# Altium PCB Propulsion_v2.PcbDoc
Units mil, origin at the board's own origin, x right, y up, seen from the top; angles counter-clockwise.
Board outline 2755.9 x 1870.08 mil, 2 copper layers (Top Layer, Bottom Layer), stack 62.441 mil thick; 23 components, 16 nets, 84 pads, 5 vias.
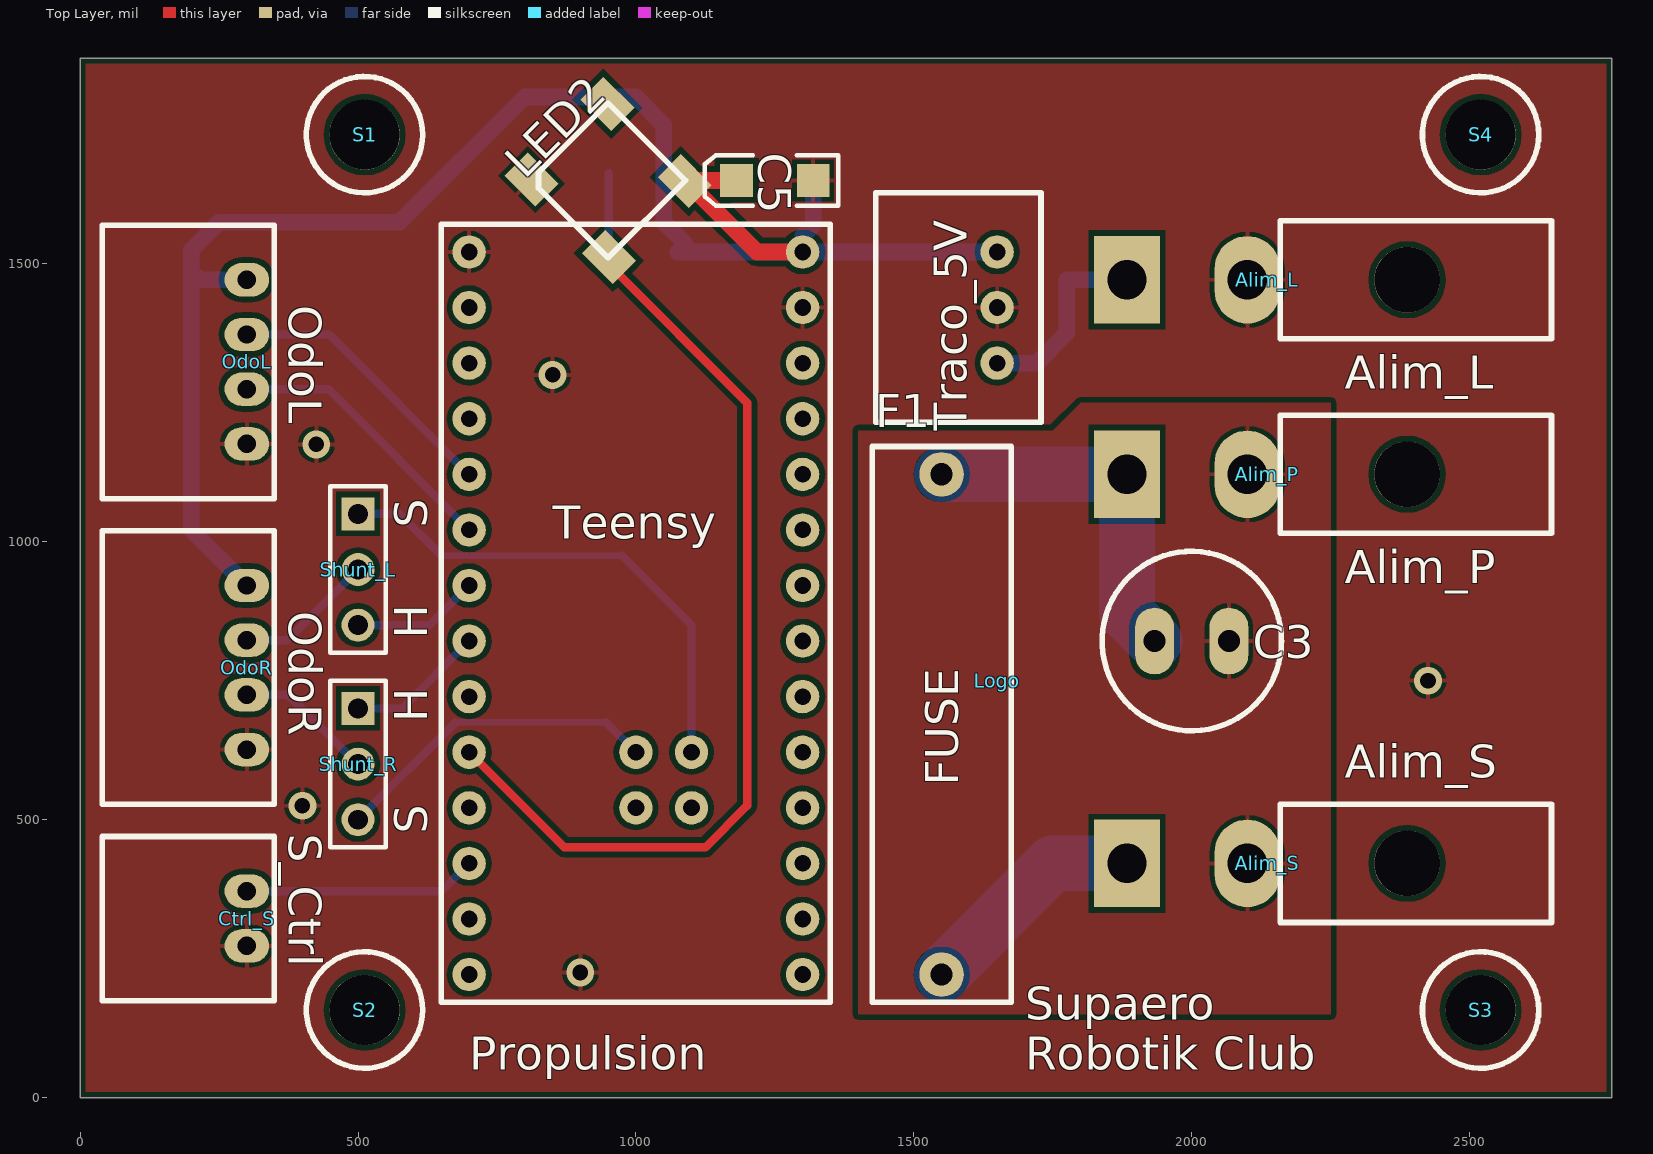
[diagram p0: Top Layer view]
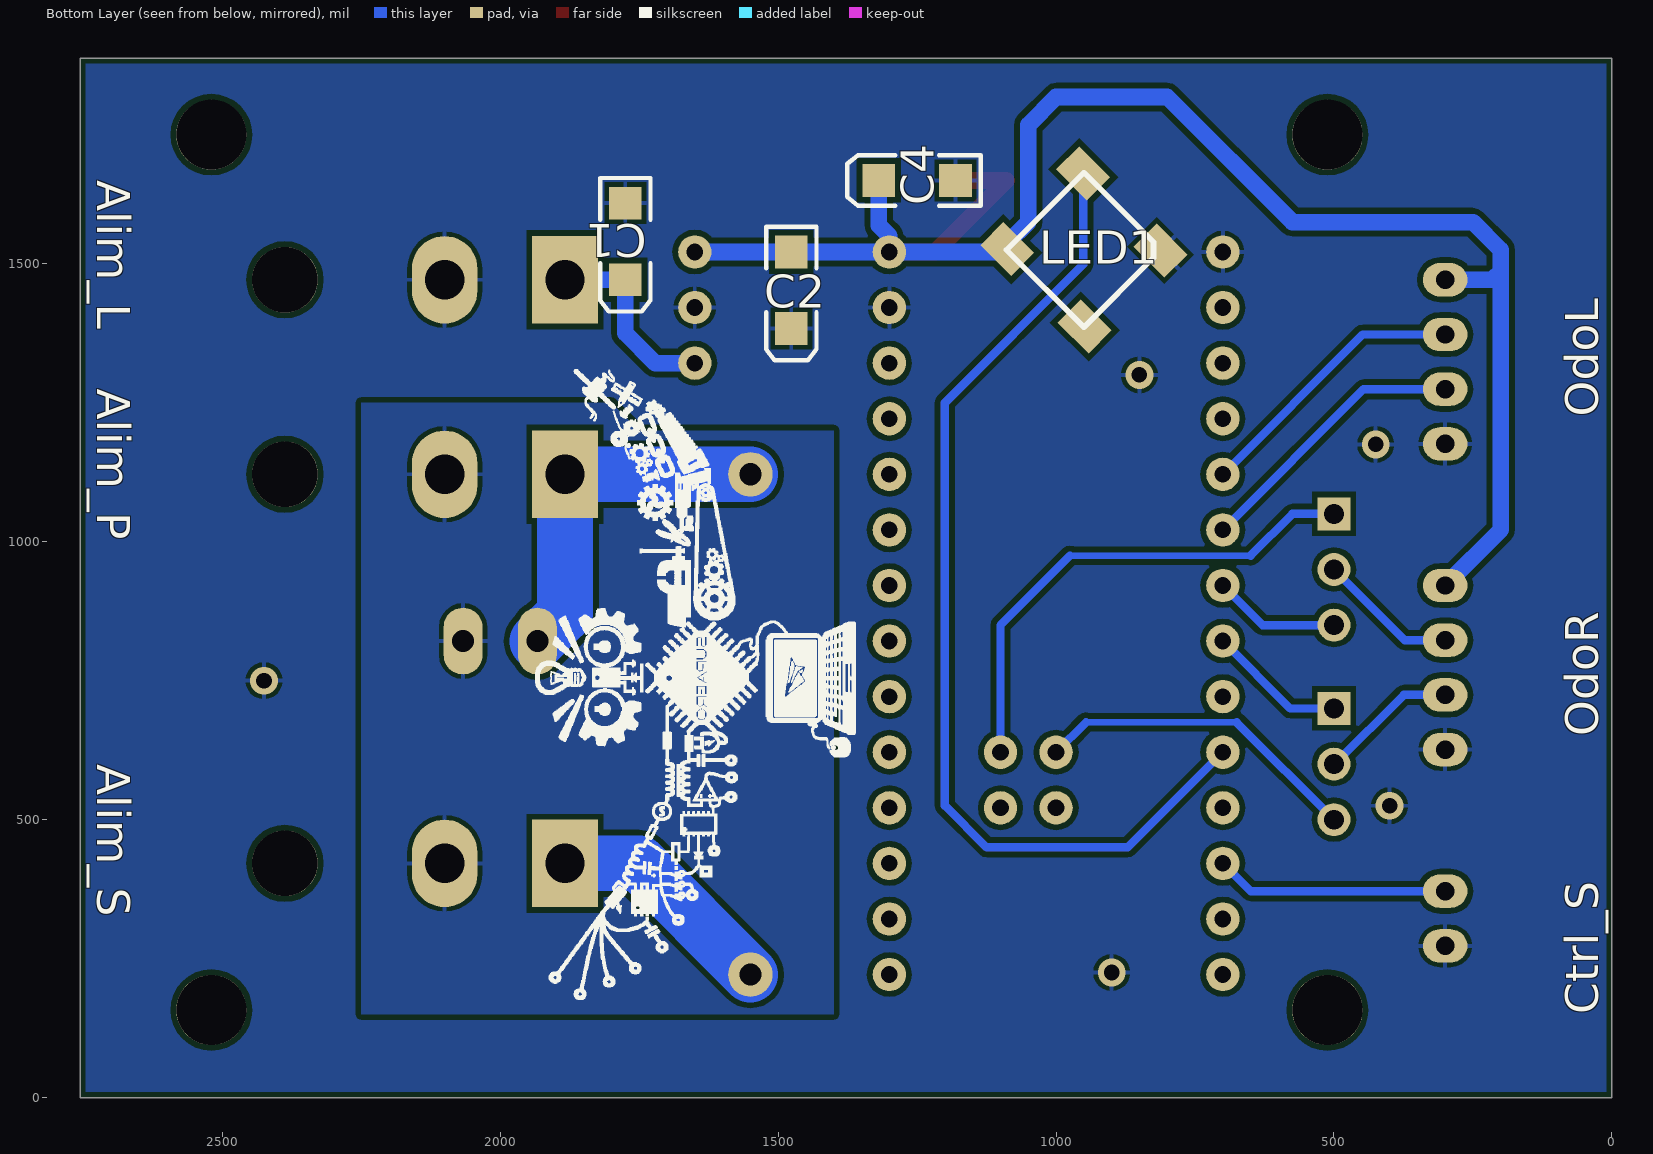
[diagram p1: Bottom Layer view, seen from below]
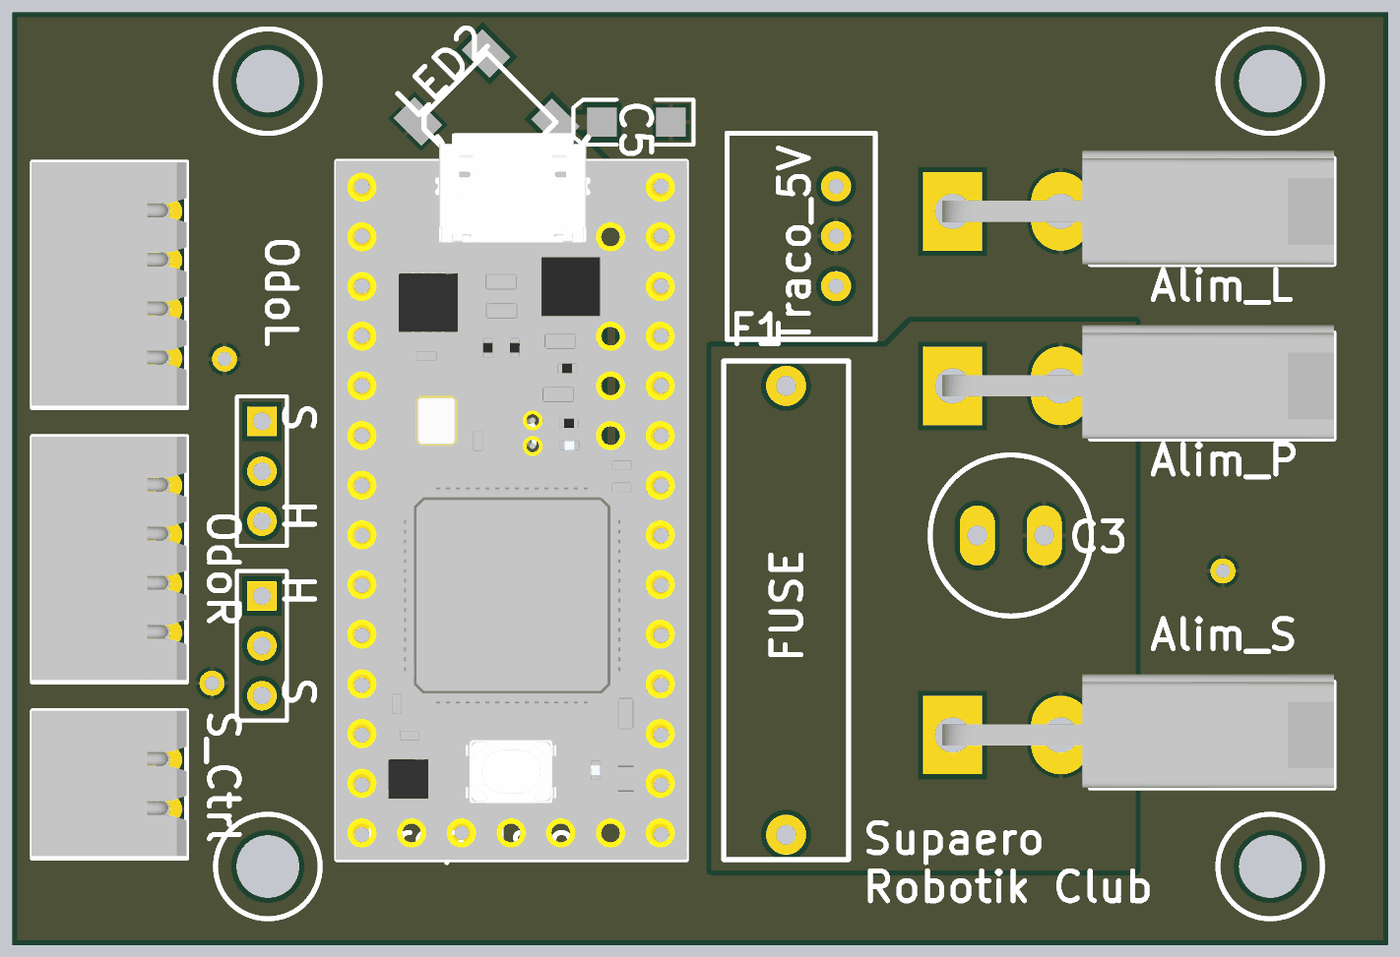
[diagram p2: 3D render of the assembled board from above, using the file's embedded part models]

## Layer stack, top to bottom
Top Solder: solder mask 0.4, Solder Resist, Dk 3.5
Top Layer: signal copper 0.7087
Dielectric1: core 61.0236, FR-4, Dk 4.8
Bottom Layer: signal copper 0.7087
Bottom Solder: solder mask 0.4, Solder Resist, Dk 3.5

## Board outline
0,0 0,1870.08 2755.9,1870.08 2755.9,0

## Design rules (kind name [scope] priority, off if disabled: settings)
BoardOutlineClearance [All] p1: gap=9.84 except(0: Arc-SplitContinuation Track-SplitContinuation SMDPad-SplitContinuation THPad-SplitContinuation Via-SplitContinuation Fill-SplitContinuation Poly-SplitContinuation Region-SplitContinuation Text-SplitContinuation)
Clearance Clearance-xPP-xTP-xTT [All] p1: gap=10
ComponentClearance [All] p1: gap=9.84 collisioncheckmode=3 verticalgap=9.84 showdistances=FALSE
ComponentClearance ComponentClearance_1 [InComponent('Logo')] p2: gap=0 collisioncheckmode=3 verticalgap=0 showdistances=FALSE
DiffPairsRouting [All] p1: maxlimit=9.84 minlimit=9.84 mostfreqgap=9.84 toplayer_minwidth=15 toplayer_maxwidth=15 toplayer_prefwidth=15 bottomlayer_minwidth=15 bottomlayer_maxwidth=15 bottomlayer_prefwidth=15 maxuncoupledlength=492.13
Height [All] p1: minheight=0 maxheight=984.25 prefheight=492.13
HoleSize HoleSize-PTH [All] p1: absolutevalues=TRUE maxlimit=78.74 minlimit=9.84 maxpercent=80.000 minpercent=20.000
HoleToHoleClearance [All] p1: gap=13.78 allowstackedmicrovias=TRUE
MinimumAnnularRing "Minimum IAR  >0.45mm" [((ObjectKind = 'Pad') OR (ObjectKind = 'Via')) And (Layer = 'MultiLayer') And (HoleDiameter > AsMM(0.45))] p1: minimumring=6.89 // minimum inner annular ring for pads > 0.45mm finished hole size
MinimumAnnularRing "Minimum IAR <=0.45mm" [((ObjectKind = 'Pad') OR (ObjectKind = 'Via')) And (Layer = 'MultiLayer') And (HoleDiameter <= AsMM(0.45))] p2: minimumring=6.89 // minimum inner annular ring for pads <= 0.45mm finished hole size
MinimumSolderMaskSliver [All] p1: minsoldermaskwidth=3.15
PlaneClearance PlaneClearance-IPI [All] p1: clearance=9.84
PlaneConnect [All] p1: planeconnectstyle=Relief reliefexpansion=6.89 reliefentries=4 reliefconductorwidth=7.87 reliefairgap=7.87
PolygonConnect PolygonConnect-xTW [All] p1: connectstyle=Relief reliefconductorwidth=7.87 reliefentries=4 polygonreliefangle="90 Angle" airgapwidth=7.87
RoutingCorners [All] p1: cornerstyle=45-Degree minsetback=98.43 maxsetback=98.43
RoutingVias "RoutingVias > 0.45mm" [(ObjectKind = 'Via') And (HoleDiameter > AsMM(0.45))] p1: holewidth=19.68 width=33.46 viastyle="Through Hole" minholewidth=19.68 minwidth=33.46 maxholewidth=35.43 maxwidth=49.21 // finishet hole size > 0.45mm
RoutingVias "RoutingVias <= 0.45mm" [(ObjectKind = 'Via') And (HoleDiameter <= AsMM(0.45))] p2: holewidth=11.81 width=25.59 viastyle="Through Hole" minholewidth=9.84 minwidth=23.62 maxholewidth=17.72 maxwidth=31.5 // finishet hole size <= 0.45mm
SilkToSilkClearance [All] p1: silktosilkclearance=7.87
SilkToSolderMaskClearance SilkscreenOverComponentPads [IsPad] p1: minsilkscreentomaskgap=7.87 clearancetoexposedcopper=TRUE
SolderMaskExpansion [All] p1: expansion=0
Width Width-xTW [All] p1: maxlimit=100 minlimit=10 preferedwidth=20
19 further rules are at their usual default settings.

## Components (designator, comment, footprint, x,y, rotation, side; value= is the part's Value field where it differs from the comment)
Alim_L "Minifit Jr 2x1H" MOLEX_MINIFITJR_2X1H 2100,1471.26 r0 top
Alim_P "Minifit Jr 2x1H" MOLEX_MINIFITJR_2X1H 2100,1121.26 r0 top
Alim_S "Minifit Jr 2x1H" MOLEX_MINIFITJR_2X1H 2100,421.26 r0 top
C1 "Cap22uF" 3.2X1.6X1.1 1775,1540.16 r270 bottom
C2 "Cap50uF" 3.2X1.6X1.1 1476.38,1452.36 r270 bottom
C3 "Cap50uF" CONDENSATEUR 2000,821.26 r0 top
C4 "Cap" 3.2X1.6X1.1 1250,1650 r0 bottom
C5 "Cap" 3.2X1.6X1.1 1250,1650 r180 top
Ctrl_S "SPOX 2x1H" "MOLEX SPOX 2X1H" 300,371.26 r270 top
F1 "10A" FUSE 1550,671.26 r90 top
LED1 "NeoPixel" Neopixel 950,1525 r135 bottom
LED2 "NeoPixel" Neopixel 950,1650 r225 top
Logo "Logo" LOGO_HIGHRES 1650,750 r270 top
OdoL "SPOX 4x1H" "MOLEX SPOX 4X1H" 300,1471.26 r270 top
OdoR "SPOX 4x1H" "MOLEX SPOX 4X1H" 300,921.26 r270 top
S1 "Screw M3" "SCREW M3" 511.81,1732.28 r0 top
S2 "Screw M3" "SCREW M3" 511.81,157.48 r0 top
S3 "Screw M3" "SCREW M3" 2519.68,157.48 r0 top
S4 "Screw M3" "SCREW M3" 2519.68,1732.28 r0 top
Shunt_L "Shunt selector" HDR1X3 500,1050 r270 top
Shunt_R "Shunt selector" HDR1X3 500,700 r270 top
Teensy "Teensy 3.2" TEENSY 600,721.26 r0 top
Traco_5V "Traco TRS2-2450" TRS0.5 1650,1421.26 r270 top

## Footprints (in the part's own frame and the unit in brackets; to place one, negate y for a bottom-side part, rotate by r counter-clockwise, add the part's x,y. Pads: shape width x height; smd on the part's side, far side on the other; paste and mask are expansions set on the pad)
3.2X1.6X1.1 [mm] "SMT LED; 2 Flat Leads"
  rect 1.5x1.5 smd: 1(-1.75,0) 2(1.75,0)
  silkscreen extent -2.9,-1.15 3.2,1.15
CONDENSATEUR [mil]
  oval 70x120 hole 40: 1(-66.93,0) 2(66.93,0)
  silkscreen extent -161,-161 161,161, body extent -161,-161 161,161, height 394
FUSE [mil]
  round 80 hole 40: 1(-450,0) 2(450,0)
  silkscreen extent -500,-125 500,125, body extent -505,-130 505,130, height 315
HDR1X3 [mm] "Connector; Header; 3 Position"
  rect 1.5x1.5 hole 0.9: 1(0,0)
  round 1.5 hole 0.9: 2(2.54,0) 3(5.08,0)
  silkscreen extent -1.27,-1.27 6.35,1.27
LOGO_HIGHRES [mil]
"MOLEX SPOX 2X1H" [mil] "Prise CI, Molex, 3 Contacts, 1 rangée, entraxe 2.5mm, 3A, Coudé, ref 22-03-5035"
  oval 60x80 hole 33: 1(0,0) 2(98.43,0)
  silkscreen extent -98,-260 197,49, body extent -98,-262 193,49, height 193
"MOLEX SPOX 4X1H" [mil] "Prise CI, Molex, 3 Contacts, 1 rangée, entraxe 2.5mm, 3A, Coudé, ref 22-03-5035"
  oval 60x80 hole 33: 1(0,0) 2(98.43,0) 3(196.85,0) 4(295.28,0)
  silkscreen extent -98,-260 394,49, body extent -98,-262 390,49, height 193
MOLEX_MINIFITJR_2X1H [mm] "Connecteur Molex 2"
  rect 3x4 hole 1.8: 1(-5.5,0)
  oval 3x4 hole 1.8: 2(0,0)
  round 3 hole 3 unplated: 3(7.3,0)
  silkscreen extent 1.5,-2.7 13.9,2.7, body extent -6.03,-2.7 13.9,3.1, height 11.01
Neopixel [mm]
  rect 1.5x2 smd: 1(2.45,-2.5) 2(2.45,2.5) 3(-2.45,2.5) 4(-2.45,-2.5)
  silkscreen extent -2.5,-2.5 2.5,2.5, body extent -2.5,-2.5 2.5,2.5, height 1.6
"SCREW M3" [mm] "M3 iso Screw"
  round 3.2 hole 3.2 unplated: 0(0,0)
  silkscreen extent -2.66,-2.66 2.66,2.66
TEENSY [mil] "Teensy 3.2"
  round 60 hole 30: 0(100,700) 1(100,600) 2(100,500) 3(100,400) 4(100,300) 5(100,200) 6(100,100) 7(100,0) 8(100,-100) 9(100,-200) 10(100,-300) 11(100,-400) 12(100,-500) 13(700,-500) 14(700,-400) 15(700,-300) 16(700,-200) 17(700,-100) 18(700,0) 19(700,100) 20(700,200) 21(700,300) 22(700,400) 23(700,500) 25(400,-100) 26(400,-200) 31(500,-200) 32(500,-100) 41(700,600) 42(700,700) 43(700,800) 44(100,800)
  silkscreen extent 50,-550 750,850, body extent 48,-550 752,907, height 505
TRS0.5 [mil]
  round 60 hole 30: 1(100,0) 2(0,0) 3(-100,0)
  silkscreen extent -207,-219 207,79, body extent -207,-218 207,79, height 402

## Part data
Alim_L Alim_P Alim_S: library part "Header 2", "Molex Minifit Jr 2x1H"
C1 C2 C3: library part Cap, "Capacitor"
C4 C5: "Capacitor"
Ctrl_S: library part "Header 2", "Molex SPOX Jr 2x1H"
F1: library part "Fuse 1", "Fuse"
OdoL OdoR: library part "Header 4H", "Molex SPOX 4x1H"
Shunt_L Shunt_R: library part "Header 3", "Header, 3-Pin"
Teensy: library part teensy3.2
Traco_5V: library part "Volt Reg", "Voltage Regulator"

## Via types
v1: diameter 50, hole 28, Top Layer to Bottom Layer, 5 vias

## Nets (pads, with @x,y where several pads share a name; then routed paths per layer and width w, separated by ;. In a path a pad name is that pad's centre, name@x,y a point inside that pad or via, vN(x,y) a via of type N, cw(c..) or ccw(c..) an arc to the next point about the centre after c; other vN are vias at no path point)
5VL: C2.1 C4.2 C5.2 LED1.3 LED2.3 OdoL.1 OdoR.1 Teensy.43 Traco_5V.3 | length 3032.3
  Top Layer w30: C5.2 1089.19,1650 1217.93,1521.26 Teensy.43
  Bottom Layer w30: 207.48,1478.74 214.96,1471.26 OdoL.1 ; OdoR.1 200,1021.26 200,1525 250,1575 575,1575 800,1800 1000,1800 1050,1750 1050,1575 1087.8,1537.2 LED1.3 ; LED1.3@1075,1521.26 Teensy.43 ; C4.2 1318.9,1568.9 1300,1550 Teensy.43 ; Traco_5V.3 C2.1 Teensy.43
24VL: Alim_L.1 C1.2 Traco_5V.1 | length 352
  Bottom Layer w30: Traco_5V.1 1721.26,1321.26 1775,1375 C1.2 Alim_L.1
24VP: Alim_P.1 C3.1 F1.2 | length 654
  Bottom Layer w100: F1.2 Alim_P.1 1883.46,870.87 C3.1
24VS: Alim_S.1 F1.1 | length 416.3
  Bottom Layer w100: F1.1 1750,421.26 Alim_S.1
A_L: OdoL.2 Teensy.3 | length 504.2
  Bottom Layer w15: OdoL.2 448.43,1372.83 Teensy.3
A_R: OdoR.2 Shunt_L.2 | length 255.7
  Bottom Layer w15: OdoR.2@302.17,825 OdoR.2 372.83,822.83 Shunt_L.2
A_R_HW: Shunt_L.1 Teensy.32 | length 911.6
  Bottom Layer w12: 650,975 975,975
  Bottom Layer w15: Shunt_L.1 575,1050 650,975 ; 975,975 1100,850 Teensy.32
A_R_SW: Shunt_L.3 Teensy.5 | length 229.5
  Bottom Layer w15: Shunt_L.3 628.74,850 Teensy.5
B_L: OdoL.3 Teensy.4 | length 504.9
  Bottom Layer w15: OdoL.3 446.85,1274.41 Teensy.4
B_R: OdoR.3 Shunt_R.2 | length 250.4
  Bottom Layer w15: OdoR.3 374.41,724.41 Shunt_R.2@498.82,600
B_R_HW: Shunt_R.3 Teensy.25 | length 594.7
  Bottom Layer w12: 675,675 946.26,675
  Bottom Layer w15: Shunt_R.3 675,675 ; 946.26,675 Teensy.25
B_R_SW: Shunt_R.1 Teensy.6 | length 250.2
  Bottom Layer w15: Shunt_R.1 578.74,700 Teensy.6
DIN: LED1.2 LED2.2 Teensy.8 | length 3535
  Top Layer w15: Teensy.8 871.26,450 1125,450 1200,525 1200,1250 951.39,1498.61 LED2.2
  Bottom Layer w15: Teensy.8 871.26,450 1125,450 1200,525 1200,1250 951.39,1498.61 LED1.2
GND: Alim_L.2 C1.1 C2.2 C4.1 C5.1 Ctrl_S.2 LED1.1 LED2.1 OdoL.4 OdoR.4 Teensy.42 Teensy.44 Traco_5V.2
  other v1: 900,225 400,525 2425,750 425,1175 850,1300
GNDP: Alim_P.2 Alim_S.2 C3.2
TX_SABER: Ctrl_S.1 Teensy.10 | length 420.7
  Bottom Layer w15: Ctrl_S.1 650,371.26 Teensy.10
pads on no net: Alim_L.3 Alim_P.3 Alim_S.3 LED1.4 LED2.4 S1.0 S2.0 S3.0 S4.0 Teensy.0 Teensy.1 Teensy.2 Teensy.7 Teensy.9 Teensy.11 Teensy.12 Teensy.13 Teensy.14 Teensy.15 Teensy.16 Teensy.17 Teensy.18 Teensy.19 Teensy.20 Teensy.21 Teensy.22 Teensy.23 Teensy.26 Teensy.31 Teensy.41

## Polygon pours and split planes (outlines as drawn)
GNDP on Bottom Layer "GNDP_L02_P000" (solid, pour order 0): 1400,1200 1750,1200 1800,1250 2250,1250 2250,150 1400,150
GND on Bottom Layer "GND_L02_P010" (solid, pour order 10): 0,0 0,1870.08 2755.91,1870.08 2755.91,0
GNDP on Top Layer "GNDP_L01_P004" (solid, pour order 4): 1400,1200 1750,1200 1800,1250 2250,1250 2250,150 1400,150
GND on Top Layer "GND_L01_P008" (solid, pour order 8): 0,1870.08 2755.91,1870.08 2755.91,0 0,0

## Silkscreen, mask and mechanical layers (free items; w line width, h text height)
Top Overlay:
  text "OdoL" at 375,1425 h60 r270
  text "Alim_L" at 2275,1275 h60
  text "S" at 625,1025 h60 r90
  text "Alim_P" at 2275,925 h60
  text "OdoR" at 375,875 h60 r270
  text "H" at 625,825 h60 r90
  text "H" at 625,675 h60 r90
  text "Alim_S" at 2275,575 h60
  text "S_Ctrl" at 375,475 h60 r270
  text "S" at 625,475 h60 r90
  text "Propulsion" at 700,50 h60
  text "Supaero / Robotik Club" at 1700,50 h60
Mechanical 1:
  the board outline again, w7.87

## Dimensions
0,0 to 2755.9,0 on Mechanical 15
0,0 to 0,1870.08 on Mechanical 15
511.81,1732.28 to 0,1870.08 on Mechanical 1
511.81,1732.28 to 0,1870.08 on Mechanical 1
2519.68,1732.28 to 2755.9,1870.08 on Mechanical 1
2519.68,1732.28 to 2755.9,1870.08 on Mechanical 1
2519.68,157.48 to 2755.9,0 on Mechanical 1
2519.68,157.48 to 2755.9,0 on Mechanical 1
511.81,157.48 to 0,0 on Mechanical 1
511.81,157.48 to 0,0 on Mechanical 1

## Text inside footprints (layer, text, board x,y; h text height)
F1: Top Overlay "FUSE" at 1580,561.26 h60 r90